# Altium PCB NX32F001T-塑料壳扳手角磨链锯通用.PcbDoc
Units mm, origin at the board's own origin, x right, y up, seen from the top; angles counter-clockwise.
Board outline 50 x 59.85 mm, 2 copper layers (Top Layer, Bottom Layer); 106 components, 62 nets, 281 pads, 301 vias.
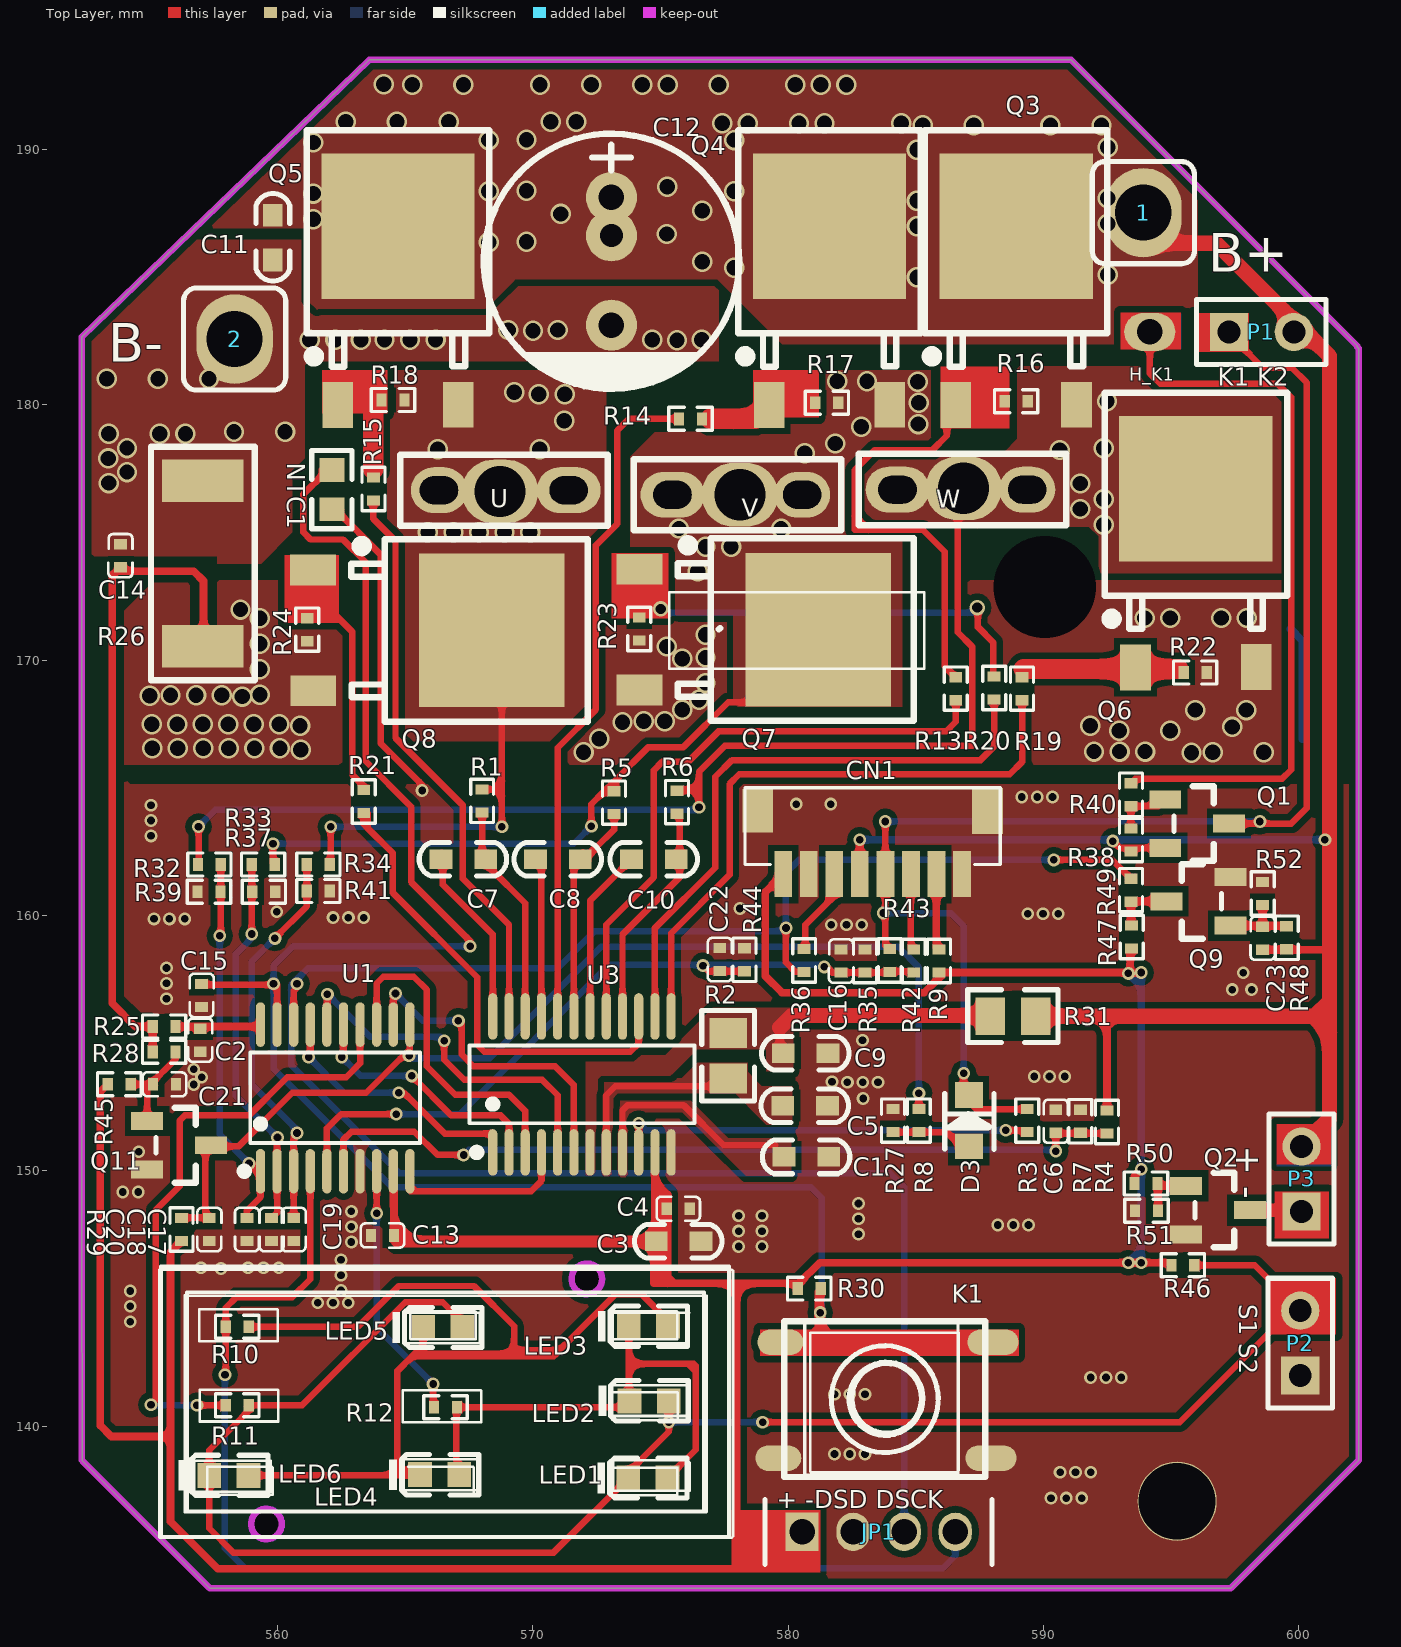
[diagram p0: Top Layer view]
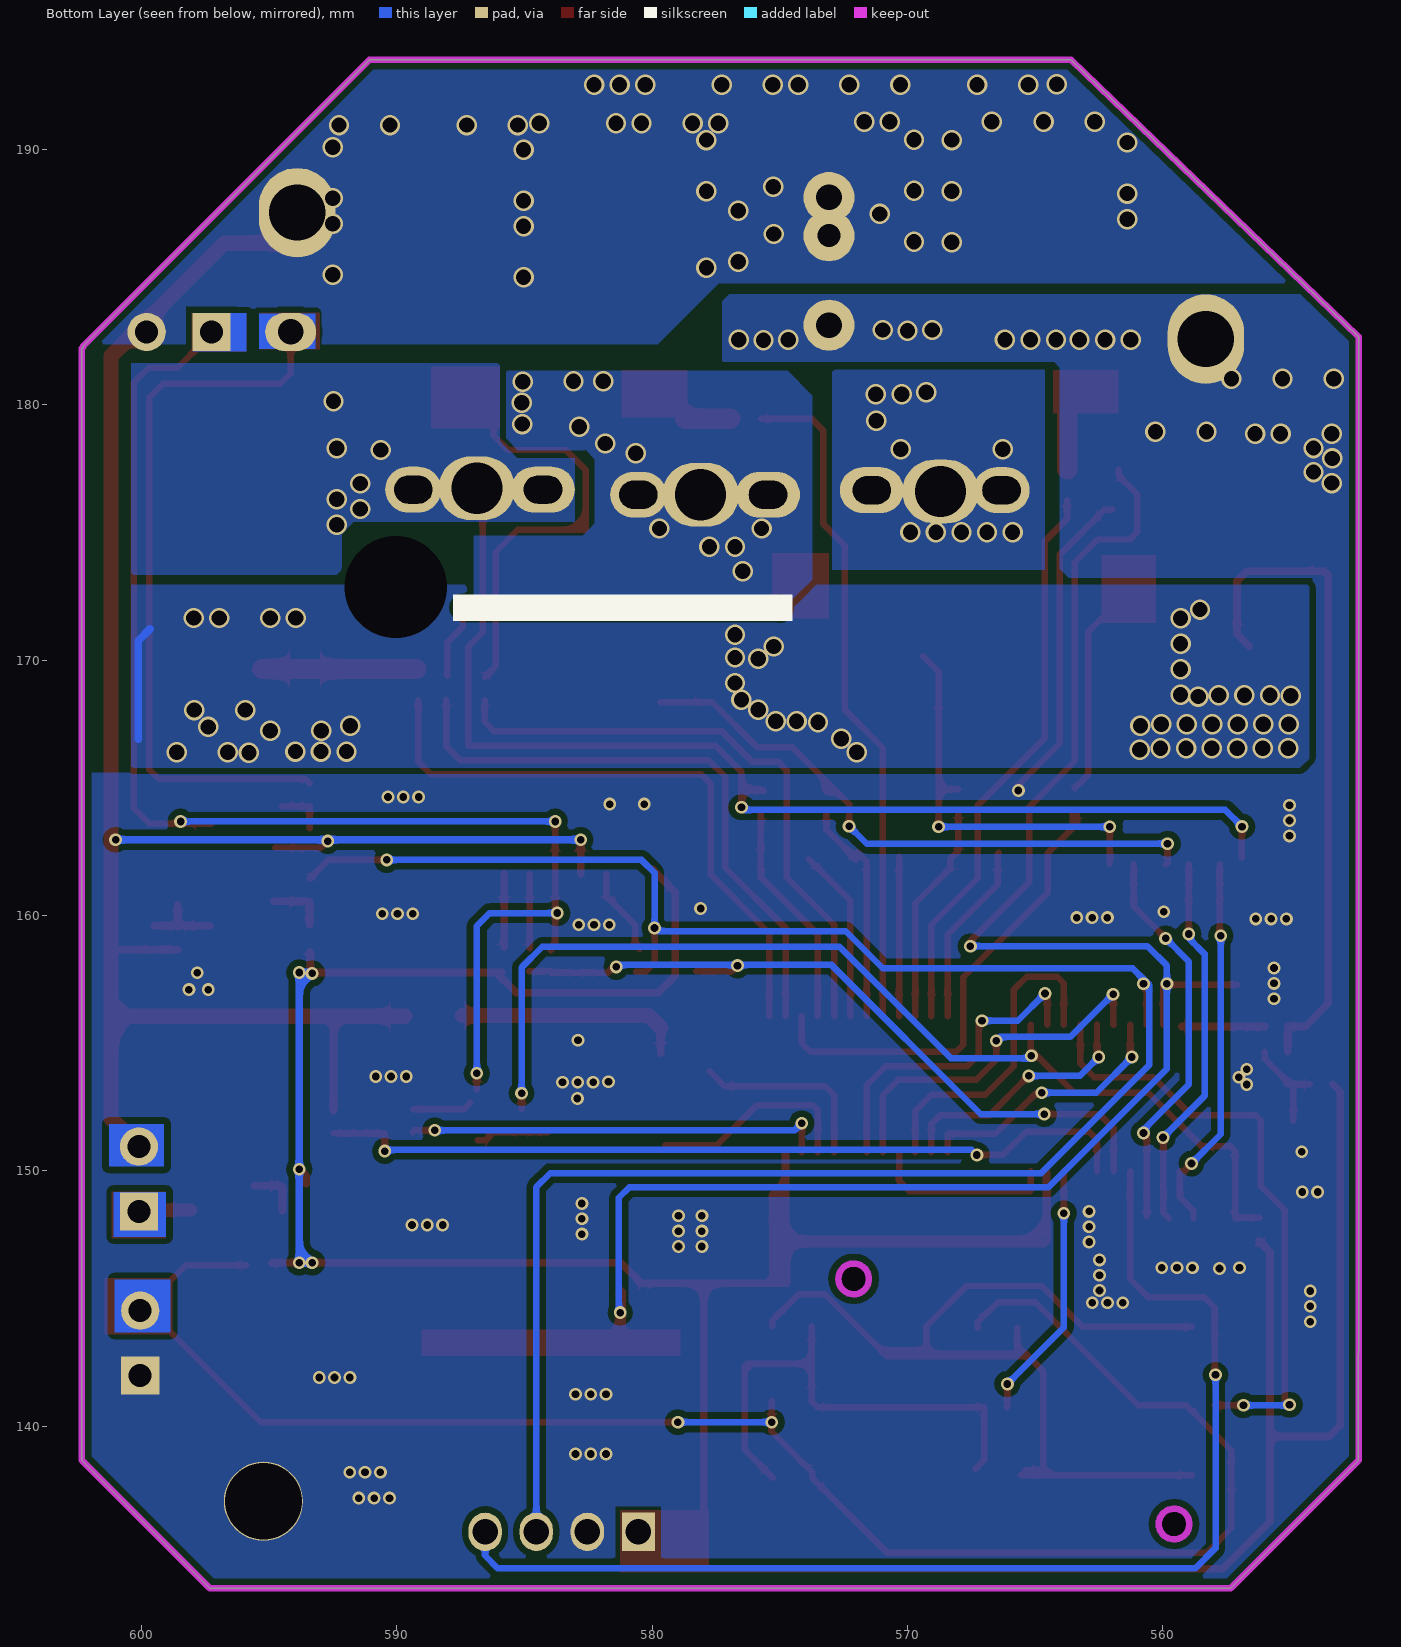
[diagram p1: Bottom Layer view, seen from below]

## Layer stack, top to bottom
Top Solder: solder mask 0.0102, Solder Resist, Dk 3.5
Top Layer: signal copper 0.0356
Dielectric 1: dielectric 0.32, FR-4, Dk 4.8
Bottom Layer: signal copper 0.0356
Bottom Solder: solder mask 0.0102, Solder Resist, Dk 3.5

## Board outline
552.356,138.638 557.335,133.66 597.335,133.66 602.335,138.66 602.335,182.212 602.286,182.26 602.286,182.308 591.085,193.51 563.585,193.51 552.335,182.663 552.335,182.66 552.335,147.105

## Design rules (kind name [scope] priority, off if disabled: settings)
Clearance [All] p1: gap=0.254
DiffPairsRouting [All] p1: maxlimit=0.3 minlimit=0.3 mostfreqgap=0.3 toplayer_minwidth=0.3 toplayer_maxwidth=6 toplayer_prefwidth=0.3 bottomlayer_minwidth=0.3 bottomlayer_maxwidth=6 bottomlayer_prefwidth=0.3 maxuncoupledlength=12.7
HoleSize [All] p1: absolutevalues=TRUE maxlimit=50 minlimit=0.025 maxpercent=80.000 minpercent=20.000
HoleToHoleClearance [All] p1 off: gap=0.254 allowstackedmicrovias=TRUE
MinimumSolderMaskSliver [All] p1 off: minsoldermaskwidth=0.254
PolygonConnect [All] p1: connectstyle=Direct reliefconductorwidth=0.254 reliefentries=4 polygonreliefangle="90 Angle" airgapwidth=0.254
RoutingVias [All] p1: holewidth=0.711 width=1.27 viastyle="Through Hole" minholewidth=0.711 minwidth=1.27 maxholewidth=0.711 maxwidth=1.27
SilkToSilkClearance [All] p1 off: silktosilkclearance=0.254
SilkToSolderMaskClearance [IsPad] p1 off: minsilkscreentomaskgap=0.254 clearancetoexposedcopper=TRUE
SolderMaskExpansion [All] p1: expansion=0.102
UnpouredPolygon [All] p1: allowunpoured=FALSE
Width [All] p1: maxlimit=5 minlimit=0.254 preferedwidth=0.254 minimp=50.000000 maximp=50.000000 favimp=50.000000
23 further rules are at their usual default settings.

## Components (designator, comment, footprint, x,y, rotation, side; value= is the part's Value field where it differs from the comment)
1 "B+" PAD-16AWG 593.903,187.528 r90 top
2 "B-" PAD-16AWG 558.317,182.575 r90 top
C1 "475/25V" C0603 580.695,150.546 r180 top
C2 "103/25V" C0402 556.971,155.118 r270 top
C3 "475/25V" C0603 575.691,147.244 r180 top
C4 "104/50V" C0402 575.691,148.514 r0 top
C5 "475/25V" C0603 580.644,152.552 r180 top
C6 "104/50V" C0402 590.474,151.943 r90 top
C7 "475/25V" C0603 567.258,162.204 r180 top
C8 "475/25V" C0603 570.967,162.204 r180 top
C9 "105/50V" C0603 580.669,154.61 r180 top
C10 "475/25V" C0603 574.726,162.204 r180 top
C11 "105/50V" C0603 559.816,186.563 r90 top
C12 "470uF/35V" CAP-TH_BD10.0-P5.00-D0.6-FD 573.075,185.623 r270 top
C13 "105/25V" C0402 564.109,147.472 r180 top
C14 "220/50V" C0402 553.847,174.092 r90 top
C15 "104/50V" C0402 557.022,156.87 r270 top
C16 "104/50V" C0402 582.066,158.217 r90 top
C17 "101/25V" C0402 559.765,147.701 r270 top
C18 "101/25V" C0402 558.8,147.701 r270 top
C19 "101/25V" C0402 560.629,147.701 r270 top
C20 "102/16V" C0402 557.327,147.701 r270 top
C21 "102/16V" C0402 555.574,153.391 r0 top
C22 "104/50V" C0402 577.317,158.275 r90 top
C23 "104/50V" C0402 598.576,159.113 r90 top
CN1 "PH1.0-8A" PH1.0-8A 583.3,162 r0 top locked
D3 "1N4148" SOD-323A 587.07,151.968 r90 top
JP1 "+ -DSD DSCK" HDR1X4 583.54,135.865 r0 top
K1 "" DOT6X6SMT 583.819,141.072 r0 top
LED1 "" 0603_LED 574.497,137.973 r180 top
LED2 "" 0603_LED 574.548,140.995 r180 top
LED3 "" 0603_LED 574.523,143.916 r180 top
LED4 "" 0603_LED 566.344,138.1 r180 top
LED5 "" 0603_LED 566.471,143.866 r180 top
LED6 "" 0603_LED 558.089,138.074 r180 top
NTC1 "100K/3950" R0603 562.127,176.682 r90 top
P1 "K1 K2" HDR1X2 597.256,182.855 r0 top
P2 "S1 S2" HDR1X2 600.05,141.986 r90 top
P3 "+ -" HDR1X2 600.1,148.412 r90 top
Q1 "MMBT5401" SOT-23-3 596.011,163.601 r0 top
Q2 "MMBT5551" SOT-23-3 596.824,148.463 r0 top
Q3 "" TO-252-2-180 588.924,180 r270 top
Q4 "" TO-252-2-180 581.609,180 r270 top
Q5 "" TO-252-2-180 564.718,180 r270 top
Q6 "" TO-252-2-180 595.96,169.723 r270 top
Q7 "" TO-252-2-180 574.167,171.196 r180 top
Q8 "" TO-252-2-180 561.391,171.171 r180 top
Q9 "2N7002" SOT-23-3 596.062,160.553 r180 top
Q11 "MMBT3904" SOT-23-3 556.14,151.003 r0 top
R1 "2R" R0402 568.007,164.49 r90 top
R2 "100R" R0805 577.647,154.508 r90 top
R3 "1K" R0402 589.356,151.968 r270 top
R4 "1M/1%" R0402 592.48,151.917 r270 top
R5 "2R" R0402 573.176,164.421 r90 top
R6 "2R" R0402 575.64,164.44 r90 top
R7 "100K/1%" R0402 591.439,151.943 r90 top
R8 "5.1K" R0402 585.114,151.968 r90 top
R9 "1K" R0402 585.902,158.217 r270 top
R10 "1K" R0402 558.419,143.891 r180 top
R11 "1K" R0402 558.419,140.818 r180 top
R12 "1K" R0402 566.572,140.741 r180 top
R13 "51R" R0402 586.562,168.885 r270 top
R14 "51R" R0402 576.174,179.451 r180 top
R15 "51R" R0402 563.753,176.708 r270 top
R16 "10K" R0402 588.924,180.137 r180 top
R17 "10K" R0402 581.508,180.086 r180 top
R18 "10K" R0402 564.515,180.188 r180 top
R19 "51R" R0402 589.153,168.885 r270 top
R20 "51R" R0402 588.061,168.91 r270 top
R21 "51R" R0402 563.372,164.465 r270 top
R22 "10K" R0402 595.935,169.52 r180 top
R23 "10K" R0402 574.167,171.221 r90 top
R24 "10K" R0402 561.162,171.196 r90 top
R25 "100R" R0402 555.556,155.651 r0 top
R26 "R002/1%/3W" "R 2512" 557.073,173.787 r270 top
R27 "30K" R0402 584.098,151.968 r90 top
R28 "1K/1%" R0402 555.556,154.661 r0 top
R29 "5.1K" R0402 556.235,147.701 r90 top
R30 "4.7K/1%" R0402 580.822,145.39 r180 top
R31 "20R" R0805 588.797,156.058 r180 top
R32 "10K/1%" R0402 557.327,162.001 r180 top
R33 "10K/1%" R0402 559.435,162.001 r0 top
R34 "10K/1%" R0402 561.594,162.001 r0 top
R35 "100K" R0402 583.006,158.217 r90 top
R36 "1K" R0402 580.619,158.242 r270 top
R37 "2K/1%" R0402 559.46,160.934 r180 top
R38 "10K" R0402 593.42,162.959 r270 top
R39 "2K/1%" R0402 557.309,160.934 r0 top
R40 "20K" R0402 593.42,164.73 r270 top
R41 "2K/1%" R0402 561.594,160.96 r180 top
R42 "1K" R0402 584.911,158.217 r270 top
R43 "10K" R0402 583.971,158.242 r90 top
R44 "2K" R0402 578.282,158.267 r90 top
R45 "10K/1%" R0402 553.796,153.391 r0 top
R46 "10K/1%" R0402 595.452,146.304 r0 top
R47 "10K" R0402 593.446,159.164 r270 top
R48 "10M" R0402 599.516,159.131 r270 top
R49 "1K" R0402 593.42,160.992 r270 top
R50 "10K/1%" R0402 594.004,149.504 r0 top
R51 "100K/1%" R0402 594.03,148.438 r180 top
R52 "300K" R0402 598.576,160.865 r270 top
U "U" CONN-TH_L6.3-W0.8-EST026 568.858,176.657 r0 top (schematic designator 5)
U1 "NX32F001T" TSSOP20_L6.5-W4.4-P0.65-LS6.4-BL 562.254,152.857 r0 top
U3 "NX6051S" SSOP-24_L8.8-W4.0-P0.64-LS6.2-BL 571.919,153.385 r180 top
V "V" CONN-TH_L6.3-W0.8-EST026 578.002,176.479 r180 top (schematic designator 4)
W "W" CONN-TH_L6.3-W0.8-EST026 586.816,176.682 r180 top (schematic designator 3)

## Footprints (in the part's own frame and the unit in brackets; to place one, negate y for a bottom-side part, rotate by r counter-clockwise, add the part's x,y. Pads: shape width x height; smd on the part's side, far side on the other; paste and mask are expansions set on the pad)
0603_LED [mm]
  rect 0.93x0.98 smd: A(-0.77,0) K(0.77,0)
  silkscreen extent -1.54,-0.79 1.97,0.79, body extent -0.8,-0.4 0.8,0.4, height 0.6
C0402 [mm]
  rect 0.4x0.5 smd: 1(0.45,0) 2(-0.45,0)
  silkscreen extent -0.85,-0.47 0.85,0.47
C0603 [mil] "无极性贴片电容"
  rect 35x30 smd: 1(-35,0) 2(34,0)
  silkscreen extent -67,-26 67,26, body extent -31,-16 31,16, height 32
CAP-TH_BD10.0-P5.00-D0.6-FD [mm]
  round 2 hole 1: 1(-2.5,0) 2(2.5,0)
  silkscreen extent -5,-5 5.08,5
CONN-TH_L6.3-W0.8-EST026 [mm]
  oval 2.2x1.8 hole 1.1 slot 1.5 at 0 deg: 1(-2.54,0)
  oval 2.5x1.8 hole 1.1 slot 1.5 at 0 deg: 2(2.54,0)
  silkscreen extent -4.06,-1.4 4.06,1.4
DOT6X6SMT [mm]
  oval 1.8x1 smd: 1(-4.13,2.22) 3(-4.21,-2.32)
  oval 2x1 smd: 2(4.2,2.22) 4(4.12,-2.32)
  silkscreen extent -3.98,-3.06 3.9,3.04
HDR1X2 [mm] "Connector; Header; 2 Position"
  rect 1.5x1.5 hole 0.9: 1(0,0)
  round 1.5 hole 0.9: 2(2.54,0)
  silkscreen extent -1.27,-1.27 3.81,1.27
HDR1X4 [mm] "Connector; Header; 4 Position"
  rect 1.3x1.5 hole 1: 1(-3,0)
  oval 1.3x1.5 hole 1: 2(-1,0) 3(1,0) 4(3,0)
  silkscreen extent -4.44,-1.27 4.44,1.27
PAD-16AWG [mm] "PTH for 16 AWG wire"
  oval 3.5x3 hole 2.2: 1(0,0)
  silkscreen extent -2,-2 2,2, body extent -0.59,-0.52 3.54,0.48, height 14.89
PH1.0-8A [mm]
  rect 1.2x1.7 smd: 0(-4.5,2.1)
  rect 1.2x1.8 smd: 0/2(4.5,2.1)
  rect 0.7x1.8 smd: 1(-3.5,-0.375) 2(-2.5,-0.375) 3(-1.5,-0.375) 4(-0.5,-0.375) 5(0.5,-0.375) 6(1.5,-0.375) 7(2.5,-0.375) 8(3.5,-0.375)
  silkscreen extent -5,0 5,3
R0402 [mm]
  rect 0.4x0.5 smd: 1(0.45,0) 2(-0.45,0)
  silkscreen extent -0.85,-0.45 0.85,0.45
R0603 [mm]
  rect 0.93x0.98 smd: 1(0.77,0) 2(-0.77,0)
  silkscreen extent -1.54,-0.79 1.53,0.79, body extent -0.85,-0.4 0.85,0.4, height 0.56
R0805 [mm]
  rect 1.16x1.47 smd: 1(0.89,0) 2(-0.89,0)
  silkscreen extent -1.77,-1.03 1.77,1.04, body extent -1,-0.63 1,0.63, height 0.49
"R 2512" [mm] "1W贴片电阻"
  rect 1.65x3.2 smd: 1(-3.24,0) 2(3.24,0)
  silkscreen extent -4.57,-2.03 4.57,2.03, body extent -3.2,-1.6 3.2,1.6, height 0.55
SOD-323A [mm]
  rect 1x1.1 smd: 1(-1.003,0) 2(1.003,0)
  silkscreen extent -1.13,-0.98 1.06,0.95
SOT-23-3 [mm]
  rect 1.25x0.7 smd: 1(-1.25,0.95) 2(-1.25,-0.95) 3(1.25,0)
  silkscreen extent -0.9,-1.46 0.65,1.46, body extent -1.5,-1.5 1.5,1.5, height 1.3
SSOP-24_L8.8-W4.0-P0.64-LS6.2-BL [mil]
  oval 14x71.8 smd: 1(137.5,104.8) 2(112.5,104.8) 3(87.5,104.8) 4(62.5,104.8) 5(37.5,104.8) 6(12.5,104.8) 7(-12.5,104.8) 8(-37.5,104.8) 9(-62.5,104.8) 10(-87.5,104.8) 11(-112.5,104.8) 12(-137.5,104.8) 13(-137.5,-104.8) 14(-112.5,-104.8) 15(-87.5,-104.8) 16(-62.5,-104.8) 17(-37.5,-104.8) 18(-12.5,-104.8) 19(12.5,-104.8) 20(37.5,-104.8) 21(62.5,-104.8) 22(87.5,-104.8) 23(112.5,-104.8) 24(137.5,-104.8)
  silkscreen extent -173,-60 173,111
TO-252-2-180 [mm] "180度编带包装"
  rect 1.8x1.2 smd: 1(0,-2.361) 3(-0.004,2.361)
  rect 5.7x6 smd: 2(-7,0)
  silkscreen extent -10.75,-3.57 -1.5,3.57, body extent -9.74,-3.27 0.2,3.27, height 2.44
TSSOP20_L6.5-W4.4-P0.65-LS6.4-BL [mm]
  oval 0.364x1.742 smd: 1(-2.925,-2.871) 2(-2.275,-2.871) 3(-1.625,-2.871) 4(-0.975,-2.871) 5(-0.325,-2.871) 6(0.325,-2.871) 7(0.975,-2.871) 8(1.625,-2.871) 9(2.275,-2.871) 10(2.925,-2.871) 11(2.925,2.871) 12(2.275,2.871) 13(1.625,2.871) 14(0.975,2.871) 15(0.325,2.871) 16(-0.325,2.871) 17(-0.975,2.871) 18(-1.625,2.871) 19(-2.275,2.871) 20(-2.925,2.871)
  silkscreen extent -3.71,-3.02 3.33,1.77

## Part data
1 2 U V W: library part EST026, "接线插片"
C1 C2 C3 C4 C5 C6 C7 C8 C9 C10 C11 C13 C14 C15 C16 C17 C18 C19 C20 C21 C22 C23: library part C, "无极性电容"
C12: library part CAP+, "直插电解电容"
CN1: library part CON8, "8pin 开关贴片座子"
D3: library part DIODE, "二极管"
JP1: library part HEAD4, "4PIN端子"
K1: library part TS-1002S-07526C, "轻触按键"
LED1 LED2 LED3 LED4 LED5 LED6: library part "0603 蓝灯", "发光二极管"
NTC1: library part Res, "贴片热敏电阻"
P1 P2 P3: library part "Header 2", "Header, 2-Pin"
Q1: library part "SOT-23 SS8550 Y2", "PNP三极管"
Q2 Q11: library part 2N3904, "NPN General Purpose Amplifier"
Q3 Q4 Q5 Q6 Q7 Q8 Q9: library part NCE3050K, "N-Channel mosfet"
R1 R3 R4 R5 R6 R7 R8 R9 R10 R11 R12 R25 R27 R28 R29 R32 R33 R34 R35 R36 R37 R38 R39 R40 R41 R42 R43 R44 R45 R46 R47 R48 R49 R50 R51 R52: library part R, "贴片电阻"
R2 R13 R14 R15 R16 R17 R18 R19 R20 R21 R22 R23 R24 R31: library part RES, "贴片电阻"
R26: library part R, "贴片合金电阻"
R30: library part Res, "贴片电阻"
U1: library part 0001, "主控IC"
U3: library part HC89F0531-SSOP24-T-M, "合封驱动IC"

## Free pads (board coordinates)
  round 0 hole 1.2 unplated: 0(559.511,136.144) 0(572.135,145.796)
  oval 3x2.5 hole 2: 0(578.104,176.479) 1(568.706,176.606) 2(586.867,176.733)
  round 0 hole 4: 0(590.042,172.872)
  round 3.1 hole 3: 0(595.224,137.058)
  oval 2x1.5 hole 1: 1(594.157,182.855)
  round 2 hole 0.9: 4(573.075,186.623)

## Via types
v1: diameter 0.8, hole 0.6, Top Layer to Bottom Layer, tented both sides, 157 vias
v2: diameter 0.5, hole 0.3, Top Layer to Bottom Layer, tented both sides, 142 vias
v3: diameter 0.6, hole 0.4, Top Layer to Bottom Layer, tented both sides, 2 vias

## Nets (pads, with @x,y where several pads share a name; then routed paths per layer and width w, separated by ;. In a path a pad name is that pad's centre, name@x,y a point inside that pad or via, vN(x,y) a via of type N, cw(c..) or ccw(c..) an arc to the next point about the centre after c; other vN are vias at no path point)
+5V: C3.2 C4.2 C13.2 CN1.1 JP1.1 R9.1 R29.2 R30.1 R45.2 R46.2 R47.1 R50.2 U1.9 U3.11 | length 171.3
  Top Layer w0.3: R45.2 553.06,153.104 553.06,140.03 553.491,139.598 555.803,139.598 ; R29.2 555.803,146.819 555.803,139.598 ; 564.529,149.098 564.555,148.017 ; U1.9@564.555,149.935 564.555,148.017 ; C3.2@574.7,147.142 574.37,147.142 ; 574.777,149.25 574.777,149.2 ; U3.11 574.777,149.581 ; C3.2@574.878,147.244 574.878,146.634 ; C3.2@574.878,147.32 574.878,147.879 ; 574.878,148.869 574.878,147.879 ; C3.2@574.996,147.244 574.996,146.136 575.107,146.025 ; 575.107,145.898 575.107,146.025 ; 577.977,145.542 577.977,145.212 ; 578.409,145.593 578.358,145.593 ; CN1.1@579.984,161.809 CN1.1 579.095,160.92 579.095,157.632 579.755,156.972 585.318,156.972 586.112,157.767 R9.1 ; 580.847,134.493 580.54,134.801 JP1.1 ; 586.163,157.767 v2@593.395,157.767 ; v2(593.319,157.734) v2@593.395,157.767 ; R47.1@593.395,158.587 v2@593.395,157.767 ; R50.2 593.554,149.791 v2(593.827,150.063) ; v2(593.819,157.767) v2@593.395,157.767 ; R46.2@594.893,146.406 v2(593.827,146.406) v2(593.319,146.406) 581.228,146.406 580.415,145.593 578.358,145.593 ; 555.803,139.598 555.803,136.271 557.657,134.417 579.092,134.417 JP1.1 ; 564.529,147.726 564.529,147.28 564.667,147.142 565.277,147.142 ; 564.529,147.726 564.555,148.017 ; 564.529,147.726 564.936,147.32 565.277,147.32 ; 564.555,148.017 565.277,147.32 ; 565.277,147.142 565.277,147.32 ; 565.277,147.142 574.37,147.142 ; 565.277,147.32 574.319,147.32 ; 574.319,147.32 574.777,147.777 ; 574.319,147.32 C3.2@574.777,147.32 ; 574.37,147.142 574.726,146.787 ; 574.726,146.787 574.726,147.091 C3.2@574.777,147.142 ; 574.726,146.787 574.726,145.593 574.802,145.593 ; 574.726,146.787 574.777,146.736 ; 574.777,146.736 C3.2@574.777,147.142 ; 574.777,146.736 574.777,146.101 574.878,145.999 ; 574.777,146.736 574.878,146.634 ; C3.2@574.777,147.142 C3.2@574.777,147.32 ; C3.2@574.777,147.32 574.777,147.777 ; 574.777,147.777 574.878,147.879 ; 574.777,147.777 574.777,149.2 ; 574.777,149.2 574.777,149.581 ; 574.777,149.2 575.107,148.869 ; 574.777,149.581 575.285,149.073 C4.2@575.285,148.692 ; 574.802,145.593 575.285,145.593 ; 574.802,145.593 575.043,145.834 ; 574.878,145.999 574.878,146.634 ; 574.878,145.999 575.043,145.834 ; 575.043,145.834 575.285,145.593 ; 575.107,146.025 575.285,145.847 ; 575.107,146.025 575.107,148.869 ; 575.107,148.869 C4.2@575.285,148.692 ; 575.285,145.593 575.285,145.847 ; 575.285,145.593 575.539,145.593 ; 575.285,145.847 575.539,145.593 ; 575.285,145.847 C4.2@575.285,148.692 ; 575.539,145.593 577.596,145.593 ; 577.596,145.593 578.358,145.593 ; 577.596,145.593 577.977,145.212 ; 577.977,145.212 577.977,136.042 578.155,135.865 JP1.1 ; 577.977,145.212 578.358,145.593
  Bottom Layer w0.3: v2(593.819,157.767) 593.351,157.767 v2(593.319,157.734) 593.827,157.226 ; v2@593.827,157.767 593.827,157.226 ; 593.827,146.914 v2(593.319,146.406) v2(593.827,146.406) 593.827,146.914 ; 593.827,146.914 593.827,157.226
BEF_U: C19.2 R34.2 R41.1 U1.3 | length 15.5
  Top Layer w0.254: v2(559.892,159.106) 561.144,160.357 R41.1 R34.2 ; C19.2@560.629,148.227 U1.3 560.629,151.359 v2(560.756,151.486)
  Bottom Layer w0.254: v2(559.892,159.106) 558.978,158.191 558.978,153.391 560.756,151.613 v2(560.756,151.486)
BEF_V: C17.2 R33.2 R37.1 U1.2 | length 15
  Top Layer w0.254: v2(558.985,159.276) R33.2 ; C17.2 559.979,148.365 U1.2 v2@559.979,151.293 ; v2@559.979,151.424 v2@559.979,151.293 ; v2(559.994,151.308) v2@559.979,151.293
  Bottom Layer w0.254: v2(558.985,159.276) 558.985,159.113 558.368,158.496 558.368,152.933 v2(559.994,151.308)
BEF_W: C18.2 R32.2 R39.1 U1.1 | length 14.8
  Top Layer w0.254: v2@557.777,159.2 R32.2 ; C18.2 558.8,148.438 559.329,148.967 U1.1 559.182,149.986 v2(558.876,150.292)
  Bottom Layer w0.254: v2(557.733,159.207) 557.733,151.435 v2(558.876,150.292)
BKIN: C20.2 Q11.3 R8.1 R29.1 U1.11 | length 41.9
  Top Layer w0.254: R29.1@556.209,148.169 C20.2@557.156,148.169 ; C20.2@557.174,148.151 557.174,150.787 Q11.3 557.422,150.971 557.438,150.955 558.47,150.955 560.575,153.06 563.474,153.06 565.179,154.766 U1.11 ; R8.1 v2(585.114,153.043)
  Bottom Layer w0.254: v2(565.15,154.508) 565.252,154.407 568.3,154.407 572.668,158.775 584.302,158.775 585.114,157.963 v2(585.114,153.043)
DIRCTION: JP1.3 R36.1 R49.2 U1.18 | length 82.9
  Top Layer w0.254: U1.18 560.629,157.049 v2@560.832,157.251 ; v2(579.907,159.512) 579.907,158.166 580.281,157.792 R36.1 ; v2(590.398,162.179) 592.684,162.179 R49.2
  Bottom Layer w0.254: JP1.3 584.54,149.368 583.997,149.911 564.769,149.911 560.527,154.153 560.527,157.277 561.188,157.937 570.967,157.937 572.414,159.385 579.78,159.385 v2(579.907,159.512) 579.907,161.671 580.415,162.179 v2(590.398,162.179)
  other v2: 560.756,157.328
DSCK: JP1.4 R10.1 U1.4 | length 47.5
  Top Layer w0.254: v2(557.936,142.011) 557.969,142.044 R10.1 557.969,144.635 558.394,145.059 560.578,145.059 561.279,145.761 U1.4
  Bottom Layer w0.254: v2(557.936,142.011) 557.936,135.23 558.724,134.442 586.054,134.442 586.54,134.928 JP1.4
GND: 2.1 C1.1 C2.1 C3.1 C4.1 C5.1 C6.1 C9.1 C11.1 C12.2 C13.1 C14.1 C15.1 C16.1 C17.1 C18.1 C19.1 C20.1 C21.1 C22.1 CN1.0 CN1.0/2 CN1.2 CN1.8 JP1.2 K1.3 K1.4 NTC1.2 P2.1 pad.0@595.224,137.058 Q2.2 Q9.2 Q11.2 R7.1 R26.1 R27.1 R35.1 R37.2 R39.2 R41.2 R44.1 R51.1 R52.2 U1.7 U3.12 | length 12.7
  Top Layer w0.254: NTC1.2@561.975,175.912 562.008,175.912 562.034,175.887 562.288,175.887 564.032,174.142 564.032,166.751 565.658,165.125 v2(565.658,164.897)
  other v1: 553.39,176.936 554.101,177.368 553.364,177.902 554.101,178.308 553.39,178.867 555.39,178.867 556.39,178.867 558.292,178.943 560.292,178.943 553.314,181.026 555.314,181.026 557.314,181.026 575.64,182.524 561.264,182.55 562.264,182.55 563.264,182.55 564.185,182.55 565.185,182.55 566.185,182.55 574.675,182.55 576.605,182.55 570.001,182.905 569.036,182.931 570.967,182.931
  other v2: 590.29,137.185 590.89,137.185 591.49,137.185 590.645,138.201 591.245,138.201 591.845,138.201 581.806,138.913 582.406,138.913 583.006,138.913 581.806,141.249 582.406,141.249 583.006,141.249 591.839,141.91 592.439,141.91 593.039,141.91 554.228,144.094 554.228,144.694 561.569,144.831 562.169,144.831 562.769,144.831 554.228,145.294 562.483,145.313 562.483,145.913 557.784,146.177 556.997,146.202 558.845,146.202 559.445,146.202 560.045,146.202 562.483,146.513 578.053,147.041 578.968,147.041 562.889,147.212 582.752,147.523 578.053,147.641 578.968,147.641 562.889,147.812 588.207,147.879 588.807,147.879 589.407,147.879 582.752,148.123 578.053,148.241 578.968,148.241 562.889,148.412 582.752,148.723 553.939,149.174 554.539,149.174 554.558,150.749 582.93,152.832 556.717,153.381 582.314,153.467 582.914,153.467 583.514,153.467 581.711,153.492 557.022,153.67 589.629,153.695 590.229,153.695 590.829,153.695 556.717,153.981 582.905,155.118 555.65,156.743 597.383,157.099 598.145,157.099 555.65,157.343 597.814,157.759 555.65,157.943 581.679,159.639 582.279,159.639 582.879,159.639 555.162,159.868 555.762,159.868 556.362,159.868 562.172,159.918 562.772,159.918 563.372,159.918 589.375,160.071 589.975,160.071 590.575,160.071 559.968,160.147 578.104,160.274 555.041,163.119 555.041,163.719 555.041,164.319 580.314,164.363 581.66,164.363 589.147,164.643 589.747,164.643 590.347,164.643
HARDWARE: C21.2 Q11.1 R28.1 R45.1 | length 4
  Top Layer w0.254: R45.1 C21.2@555.015,153.391 ; Q11.1 554.89,153.265 C21.2@555.015,153.391 ; C21.2 C21.2@555.015,153.391 ; R28.1 556.006,154.381 C21.2@555.015,153.391
HIN1: U1.17 U3.1 | length 10.5
  Top Layer w0.254: v2(561.213,154.457) 561.279,154.524 U1.17 ; v2(564.744,153.06) 564.947,153.06 566.547,151.46 568.427,151.46 U3.1
  Bottom Layer w0.254: v2(561.213,154.457) 562.61,153.06 v2(564.744,153.06)
HIN2: U1.15 U3.2 | length 10.1
  Top Layer w0.254: v2(562.508,154.457) 562.58,154.529 U1.15 ; v2(565.252,153.721) 566.801,152.171 568.731,152.171 569.062,151.841 U3.2
  Bottom Layer w0.254: v2(562.508,154.457) 563.245,153.721 v2(565.252,153.721)
HIN3: U1.13 U3.3 | length 13.1
  Top Layer w0.254: U1.13 563.879,157.352 564.134,157.607 565.328,157.607 565.836,157.099 565.836,154.102 566.953,152.984 569.062,152.984 569.697,152.349 U3.3
I_SENSE: C2.2 R25.1 U1.20 | length 3.2
  Top Layer w0.3: R25.1 U1.20@559.252,155.651
KEY: C15.2 K1.1 K1.2 NTC1.1 R30.2 U1.19 | length 85
  Top Layer w0.254: C15.2@557.087,157.288 559.979,157.288 U1.19 ; NTC1.1@561.729,177.452 561.729,177.224 561.01,176.505 561.01,175.006 561.289,174.727 562.559,174.727 563.448,173.838 563.448,166.04 565.226,164.262 565.226,161.315 567.538,159.004 v2(567.538,158.801) ; K1.1 581.304,143.292 ; 580.949,143.662 581.16,143.874 v2@581.16,144.569 ; R30.2@581.16,145.263 v2@581.16,144.569 ; v2(581.254,144.45) 581.254,143.84 ; R30.2 v2@581.272,144.501 ; R30.2@581.279,145.186 v2@581.279,144.501 ; 581.33,143.535 581.304,143.561 ; 581.736,143.535 581.304,143.967 ; K1.2 582.244,143.292 ; v2@581.16,144.569 v2@581.228,144.501 ; v2@581.228,144.501 581.228,143.866 581.254,143.84 ; v2@581.228,144.501 v2@581.272,144.457 ; v2@581.228,144.501 v2@581.272,144.501 ; 581.254,143.84 581.254,143.342 581.304,143.292 ; 581.254,143.84 581.272,143.822 ; 581.272,143.822 581.279,143.815 ; 581.272,143.822 v2@581.272,144.457 ; 581.272,143.822 581.272,143.593 581.279,143.586 ; v2@581.272,144.457 v2@581.279,144.45 ; v2@581.272,144.457 v2@581.272,144.501 ; v2@581.272,144.501 v2@581.279,144.501 ; 581.279,143.586 581.304,143.561 ; 581.279,143.586 581.279,143.815 ; 581.279,143.815 581.279,143.993 ; 581.279,143.993 v2@581.279,144.45 ; 581.279,143.993 581.304,143.967 ; v2@581.279,144.45 v2@581.279,144.501 ; v2@581.279,144.45 581.304,144.424 581.304,143.967 ; 581.304,143.292 581.863,143.292 ; 581.304,143.292 581.304,143.561 ; 581.304,143.561 581.304,143.967 ; 581.863,143.292 582.1,143.528 582.1,143.436 582.244,143.292 ; 581.863,143.292 582.244,143.292
  Bottom Layer w0.254: v2(567.538,158.801) 560.603,158.801 559.841,158.039 559.841,154 564.49,149.352 580.898,149.352 581.304,148.946 581.304,144.501 v2(581.254,144.45)
  other v2: 559.841,157.328
KEY_EN: CN1.5 D3.2 P1.1 Q1.3 R3.2 R43.1 | length 55.8
  Top Layer w0.254: v2(583.8,163.684) CN1.5 583.8,158.813 R43.1@583.971,158.641 ; D3.2@586.867,153.175 v2(586.867,153.822) ; D3.2@587.121,152.667 587.37,152.418 R3.2 ; P1.1 597.256,182.778 598.576,181.458 599.719,181.458 600.304,180.873 600.304,164.211 599.694,163.601 Q1.3
  Bottom Layer w0.254: v2(583.717,160.096) 586.359,160.096 586.867,159.588 v2(586.867,153.822) ; v2(583.8,163.684) v2(598.468,163.684)
LED1: LED1.A LED2.K LED3.K LED4.A R12.2 | length 21.2
  Top Layer w0.254: LED4.A@567.342,138.328 567.004,138.667 567.004,140.741 573.524,140.741 LED2.K 573.753,141.021 573.753,142.13 ; LED3.K 573.753,142.756 ; LED1.A 576.377,139.082 576.377,142.138 ; 573.753,142.13 574.065,142.443 ; 573.753,142.13 573.753,142.443 ; 573.753,142.443 573.753,142.756 ; 573.753,142.443 574.065,142.443 ; 573.753,142.756 574.065,142.443 ; 574.065,142.443 576.072,142.443 ; 576.072,142.443 576.377,142.138 ; 576.072,142.443 576.301,142.443 576.377,142.367 576.377,142.138
LED2: LED1.K LED2.A LED5.A LED6.K P2.2 R11.2 R46.1 | length 69
  Top Layer w0.254: LED5.A 567.241,144.086 566.471,144.856 564.998,144.856 560.959,140.818 559.079,140.818 557.319,139.057 LED6.K 557.319,136 558.267,135.052 570.806,135.052 LED1.K 573.727,138.193 575.318,139.784 v2(575.318,140.157) LED2.A ; v2(578.993,140.157) 595.325,140.157 599.694,144.526 P2.2 598.272,146.304 R46.1
  Bottom Layer w0.254: v2(575.318,140.157) v2(578.993,140.157)
LED3: LED3.A LED4.K LED5.K LED6.A R10.2 | length 45.6
  Top Layer w0.254: LED6.A 564.363,138.074 ; R10.2 563.143,143.891 564.744,145.491 567.69,145.491 569.265,143.916 569.265,143.129 ; LED4.K@565.396,138.278 564.769,138.278 ; LED4.K 565.548,138.074 564.972,138.074 ; LED5.K 565.701,143.172 ; 571.106,143.04 571.043,142.977 ; LED3.A 575.293,144.137 574.269,145.161 573.227,145.161 571.043,142.977 ; 564.363,138.074 564.693,138.405 ; 564.363,138.074 564.972,138.074 ; 564.693,138.405 564.693,138.354 564.769,138.278 ; 564.693,138.405 564.693,142.164 565.277,142.748 ; 564.769,138.278 564.972,138.074 ; 565.277,142.748 565.582,143.053 ; 565.277,142.748 565.582,142.748 ; 565.582,142.748 565.582,143.053 ; 565.582,142.748 569.265,142.748 ; 565.582,143.053 565.701,143.172 ; 565.701,143.172 565.701,142.972 565.836,142.837 568.973,142.837 ; 568.973,142.837 569.265,143.129 ; 568.973,142.837 569.265,142.837 ; 569.265,142.748 569.354,142.748 ; 569.265,142.748 569.265,142.837 ; 569.265,142.837 569.354,142.748 ; 569.265,142.837 569.265,143.129 ; 569.265,143.129 569.417,142.977 ; 569.354,142.748 569.646,142.748 ; 569.417,142.977 571.043,142.977 ; 569.417,142.977 569.646,142.748 ; 569.646,142.748 570.814,142.748 571.043,142.977
LIN1: U1.10 U3.4 | length 7.6
  Top Layer w0.254: U1.10 U1.10@565.179,149.45 ; U3.4 570.332,149.606 569.925,149.2 565.429,149.2 ; U1.10@565.179,149.45 565.179,149.221 565.201,149.2 565.429,149.2 ; U1.10@565.179,149.45 565.429,149.2
LIN2: U1.16 U3.5 | length 14.5
  Top Layer w0.254: U1.16 561.95,155.748 v2(561.95,156.921) ; v2(566.522,155.092) 566.522,154.356 567.309,153.568 570.357,153.568 570.967,152.959 U3.5
  Bottom Layer w0.254: v2(561.95,156.921) 563.626,155.245 566.369,155.245 v2(566.522,155.092)
LIN3: U1.12 U3.6 | length 13
  Top Layer w0.254: U1.12 564.529,156.859 v2(564.617,156.947) ; v2@567.207,155.88 567.207,154.559 567.665,154.102 570.865,154.102 571.602,153.365 U3.6
  Bottom Layer w0.254: v2(564.617,156.947) 565.683,155.88 v2(567.08,155.88)
Net3_1: pad.1@594.157,182.855 R40.2 | length 28.6
  Top Layer w0.254: R40.2 593.594,165.354 599.338,165.354 599.694,165.71 599.694,180.289 599.161,180.823 594.563,180.823 594.157,181.229 pad.1@594.157,182.855
NetC1_2: C1.2 U3.9 | length 8.4
  Top Layer w0.254: U3.9 573.507,152.375 573.71,152.578 575.894,152.578 577.469,151.003 579.492,151.003
NetC5_2: C5.2 R2.2 U3.8 | length 7.5
  Top Layer w0.254: U3.8 572.872,152.959 573.227,153.314 577.165,153.314 R2.2@577.748,153.898
NetC7_1: C7.1 R1.2 U3.22 | length 8.7
  Top Layer w0.254: R1.2 568.007,162.531 568.334,162.204 568.334,161.839 569.697,160.477 U3.22
NetC7_2: C7.2 U3.24 | length 7.2
  Top Layer w0.254: C7.2@566.436,162.458 566.471,162.424 566.471,161.214 568.427,159.258 U3.24
NetC8_1: C8.1 R5.2 U3.19 | length 8.8
  Top Layer w0.254: U3.19 571.602,162.119 C8.1@571.967,162.484 ; 572.483,162.67 573.176,163.363 R5.2
  Top Layer w0.3: C8.1@572.017,162.204 572.483,162.67
NetC8_2: C8.2 U3.21 | length 6.3
  Top Layer w0.254: U3.21 C8.2@570.332,162.306
NetC9_2: C9.2 R2.1 R31.1 U3.7 | length 9
  Top Layer w0.3: C9.2@579.669,154.61 579.669,155.616
  Top Layer w0.6: 579.669,155.616 580.136,156.083 R31.1@587.45,156.083
NetC10_1: C10.1 R6.2 U3.16 | length 8.9
  Top Layer w0.254: U3.16 573.507,159.258 575.742,161.493 R6.2@575.742,164.04
NetC10_2: C10.2 U3.18 | length 6.8
  Top Layer w0.254: U3.18 572.237,160.579 C10.2
NetC14_2: C14.2 pad.0@590.042,172.872 Q6.3 Q7.3 Q8.3 R22.2 R23.2 R24.2 R25.2 R26.2 R28.2 | length 30.8
  Top Layer w0.3: R28.2 R25.2 554.431,155.651 553.517,156.566 553.517,173.304 553.699,173.487 556.712,173.487 557.098,173.101 557.098,171.029 R26.2@556.616,170.547
  Bottom Layer w0.3: 599.669,171.221 600.126,170.764 600.126,166.903
  other v1: 595.792,166.37 571.983,166.395 596.618,166.395 598.618,166.395 591.972,166.421 592.972,166.421 593.972,166.421 560.904,166.493 555.092,166.548 556.092,166.548 557.092,166.548 558.092,166.548 559.092,166.548 560.092,166.548 572.592,166.929 592.963,167.234 594.963,167.234 597.383,167.386 560.879,167.433 591.82,167.437 555.066,167.488 556.066,167.488 557.066,167.488 558.066,167.488 559.066,167.488 560.066,167.488 573.507,167.564 574.345,167.615 575.158,167.615 575.843,168.056 595.932,168.046 597.932,168.046 576.504,168.453 558.618,168.576 554.99,168.605 555.806,168.631 556.806,168.631 557.806,168.631 559.308,168.645 576.758,169.107 559.308,169.645 575.843,170.056 576.758,170.107 575.234,170.536 559.308,170.645 576.758,170.993 559.308,171.645 593.957,171.653 594.957,171.653 596.957,171.653 597.957,171.653 558.546,171.983
NetC23_1: C23.1 Q9.1 R48.2 R52.1 | length 3
  Top Layer w0.3: Q9.1 C23.1@598.576,159.603 ; C23.1 C23.1@598.576,159.603 ; R52.1 C23.1@598.576,159.603 ; R48.2@599.494,159.603 C23.1@598.576,159.603
NetCN1_3: CN1.3 R36.2 | length 3.5
  Top Layer w0.254: R36.2@580.492,158.692 580.669,158.87 580.669,159.639 581.8,160.77 CN1.3
NetCN1_6: CN1.6 R42.2 | length 2.9
  Top Layer w0.254: R42.2@584.8,158.717 CN1.6
NetCN1_7: CN1.7 R9.2 | length 2.9
  Top Layer w0.3: R9.2@585.8,158.768 CN1.7
NetD3_1: D3.1 R8.2 R27.2 | length 2.9
  Top Layer w0.254: R27.2 R8.2 586.217,151.518 586.537,151.198 D3.1@586.837,151.198
NetP3_1: P3.1 Q2.3 | length 2
  Top Layer w0.5: Q2.3 P3.1@600.05,148.463
NetQ1_1: Q1.1 R38.2 R40.1 | length 1.9
  Top Layer w0.254: R38.2 R40.1 Q1.1@594.49,164.28
NetQ2_1: Q2.1 R50.1 R51.2 | length 2
  Top Layer w0.3: R51.2 594.48,149.347 594.546,149.413 Q2.1
NetQ3_1: Q3.1 R13.2 R16.1 | length 17
  Top Layer w0.254: Q3.1@586.207,179.477 586.207,178.79 585.649,178.232 583.387,178.232 582.6,177.444 582.6,175.666 ; R13.2 586.13,169.766 586.13,174.244 585.267,175.108 583.159,175.108 ; 582.6,175.666 582.6,175.108 583.159,175.108 ; 582.6,175.666 583.159,175.108
NetQ4_1: Q4.1 R14.2 R17.1 | length 1.8
  Top Layer w0.8: 576.944,179.451 Q4.1@578.699,179.451
NetQ5_1: Q5.1 R15.2 R18.1 | length 2.6
  Top Layer w0.8: 563.753,177.478 563.753,180.069
NetQ6_1: Q6.1 R19.2 R22.1 | length 6
  Top Layer w0.8: 589.229,169.655 595.274,169.655
NetQ7_1: Q7.1 R20.2 R23.1 | length 15.5
  Top Layer w0.254: v3@587.426,172.187 587.426,171.298 588.035,170.688 588.035,169.639 R20.2@588.035,169.385
  Bottom Layer w0.254: v3(575.005,172.009) 575.158,171.856 v3@587.4,171.856
  other v3: 587.4,172.06
NetQ8_1: Q8.1 R21.2 R24.1 | length 8.5
  Top Layer w0.254: 561.162,171.966 562.069,171.966 562.915,171.12 562.915,165.525 R21.2@563.448,164.991
NetQ9_3: Q9.3 R47.2 R49.1 | length 2.2
  Top Layer w0.3: R47.2@593.42,159.639 R49.1 ; R49.1@593.489,160.553 Q9.3
NetR3_1: R3.1 U3.10 | length 16.5
  Top Layer w0.254: U3.10 v2(574.142,151.867) ; v2(588.518,151.587) 589.313,151.587 R3.1@589.382,151.518
  Bottom Layer w0.254: v2(574.142,151.867) 574.421,151.587 v2(588.518,151.587)
NetR11_1: R11.1 U1.14 | length 24
  Top Layer w0.254: v2(555.041,140.843) 555.219,141.021 555.219,148.463 556.158,149.403 556.158,151.968 556.362,152.171 558.876,152.171 560.375,153.67 562.686,153.67 563.23,154.213 U1.14 ; v2(556.844,140.818) R11.1
  Bottom Layer w0.254: v2@555.066,140.818 v2(556.844,140.818)
NetR12_1: R12.1 U1.8 | length 10.6
  Top Layer w0.254: v2(563.88,148.336) U1.8 ; v2(566.09,141.656) 566.09,140.774 R12.1
  Bottom Layer w0.254: v2(563.88,148.336) 563.88,144.221 563.88,143.866 ; 564.185,143.561 563.88,143.866 ; v2(566.09,141.656) 563.88,143.866
ON/OFF: C16.2 C22.2 R35.2 R42.1 R43.2 R44.2 U1.5 | length 29.2
  Top Layer w0.254: U1.5 561.93,151.669 562.483,152.222 v2(564.642,152.222) ; v2(576.656,158.039) 576.878,157.817 R44.2 ; v2(581.406,157.988) 581.406,158.09 581.729,157.767 C16.2 R35.2 R43.2@583.946,157.767 ; R43.2@583.946,157.817 R42.1@584.81,157.817
  Bottom Layer w0.254: v2(564.642,152.222) 567.131,152.222 572.973,158.064 581.33,158.064 v2(581.406,157.988)
U: pad.1@568.706,176.606 Q5.3 Q8.2 R1.1 R18.2 R34.1 U.1 U.2 | length 16.7
  Top Layer w0.254: R34.1@562.077,162.034 v2(562.077,163.474) ; R1.1 568.445,164.94 ; 568.739,164.94 568.51,164.94 ; v2(568.782,163.474) 568.782,164.668 ; Q8.2@569.4,170.162 568.782,169.544 568.782,165.278 ; 568.445,164.94 568.782,165.278 ; 568.445,164.94 568.51,164.94 ; 568.51,164.94 568.782,164.668 ; 568.782,164.668 568.782,165.278
  Bottom Layer w0.254: v2(562.077,163.474) v2(568.782,163.474)
  other v1: 565.887,175.006 566.887,175.006 567.887,175.006 568.887,175.006 569.887,175.006 566.268,178.257 570.268,178.257 571.221,179.375 570.23,180.416 571.246,180.416 569.265,180.492
UH: R15.1 U3.23 | length 22.4
  Top Layer w0.254: R15.1 563.753,175.531 564.617,174.668 564.617,166.954 567.258,164.313 567.258,161.442 569.062,159.639 U3.23
UL: R21.1 U3.15 | length 19.1
  Top Layer w0.254: R21.1 563.372,163.583 563.524,163.431 ; R21.1@563.524,164.015 563.524,163.431 ; U3.15 574.142,154.991 573.811,154.661 568.096,154.661 567.817,154.94 567.817,157.582 564.515,160.884 564.515,162.44 563.524,163.431
V: pad.0@578.104,176.479 Q4.3 Q7.2 R5.1 R17.2 R33.1 V.1 V.2 | length 24.4
  Top Layer w0.254: v2(559.816,162.814) 559.816,162.07 R33.1 ; v2(572.287,163.5) 572.287,164.363 572.745,164.821 ; R5.1@573.168,164.821 572.745,164.821 ; R5.1@573.227,164.879 573.227,165.303 ; Q7.2@579.679,168.351 577.647,168.351 575.894,166.599 574.523,166.599 573.227,165.303 ; 572.745,164.821 573.227,165.303
  Bottom Layer w0.254: v2(559.816,162.814) 571.602,162.814 v2(572.287,163.5)
  other v1: 576.453,173.482 576.758,174.447 577.758,174.447 575.716,175.158 579.716,175.158 580.644,178.105 581.838,178.486 582.854,179.146 585.089,179.248 585.114,180.086 585.064,180.899 581.914,180.924 583.082,180.924
VBUS: C6.2 R4.1 R7.2 U1.6 | length 32.4
  Top Layer w0.254: U1.6 562.58,151.227 562.889,151.536 565.353,151.536 566.268,150.622 v2(567.284,150.622) ; v2(590.474,150.774) 590.474,151.442 590.499,151.467 R4.1
  Bottom Layer w0.254: v2(567.284,150.622) 567.487,150.825 v2@590.474,150.825
VH: R14.1 U3.20 | length 26.5
  Top Layer w0.254: U3.20 570.967,166.573 572.465,168.072 572.465,174.498 573.303,175.336 573.303,178.994 573.761,179.451 R14.1
VIN: 1.1 C11.2 C12.1 C23.2 CN1.4 P1.2 P3.2 pad.4 Q1.2 Q3.2 Q4.2 Q5.2 R4.2 R31.2 R38.1 R48.1 | length 83.4
  Top Layer w0.254: v2(592.709,162.916) 592.973,162.651 Q1.2
  Top Layer w0.3: CN1.4 v2(582.8,162.969) ; 591.998,156.058 592.48,155.575 ; R4.2 592.48,155.575 ; 592.48,155.931 592.48,155.651 ; 592.887,156.058 592.48,155.651 ; C23.2 601.105,158.663 ; 592.48,155.575 592.48,155.651
  Top Layer w0.6: R31.2 591.998,156.058 592.887,156.058 600.558,156.058 ; 1.1@593.674,186.563 593.903,186.334 596.748,186.334 599.796,183.286 P1.2 ; P1.2@599.796,182.677 600.431,182.677 601.193,181.915 601.193,156.642 ; P3.2 601.193,152.044 601.193,155.423 ; 600.558,156.058 600.608,156.058 ; 600.558,156.058 601.193,155.423 ; 600.608,156.058 601.193,156.642 ; 600.608,156.058 600.989,156.058 601.193,156.261 ; 601.193,155.423 601.193,156.261 ; 601.193,156.261 601.193,156.642
  Bottom Layer w0.3: v2(582.8,162.969) 601.012,162.969 v2(601.015,162.966)
  other v1: 585.038,184.992 592.506,185.094 577.875,185.369 576.631,185.602 568.274,186.369 569.747,186.385 575.234,186.69 585.038,186.992 592.506,187.094 561.391,187.274 571.094,187.477 576.631,187.602 585.038,187.992 592.506,188.094 561.391,188.274 568.274,188.369 577.875,188.369 569.747,188.385 575.259,188.544 585.038,189.992 592.506,190.094 561.391,190.274 568.274,190.369 569.747,190.385 577.875,190.369 585.267,190.957 587.267,190.957 590.267,190.957 592.267,190.957 577.418,191.033 578.418,191.033 580.418,191.033 581.418,191.033 584.418,191.033 562.673,191.084 564.673,191.084 566.699,191.084 570.699,191.084 571.699,191.084 565.277,192.532 567.277,192.532 570.277,192.532 572.277,192.532 574.277,192.532 575.277,192.532 577.277,192.532 580.277,192.532 581.277,192.532 582.277,192.532 564.159,192.557
VL: R20.1 U3.14 | length 23.6
  Top Layer w0.254: U3.14 574.777,159.512 577.139,161.874 577.139,165.43 577.799,166.091 587.527,166.091 588.061,166.624 R20.1
W: pad.2 Q3.3 Q6.2 R6.1 R16.2 R32.1 W.1 W.2 | length 48.2
  Top Layer w0.254: 556.903,162.255 v2(556.903,163.482) ; R6.1 576.166,164.89 ; R6.1@575.742,164.94 576.217,164.94 ; 576.46,164.94 576.217,164.94 ; v2(576.504,164.236) 576.504,164.617 ; W.1@589.109,176.725 587.29,176.725 586.638,176.073 586.638,171.094 587.197,170.536 587.197,166.649 577.52,166.649 576.504,165.633 576.504,165.227 ; 576.166,164.89 576.232,164.89 576.504,164.617 ; 576.166,164.89 576.217,164.94 ; 576.217,164.94 576.504,165.227 ; 576.504,164.617 576.504,165.227
  Bottom Layer w0.254: v2(556.903,163.482) 557.555,164.135 576.402,164.135 v2(576.504,164.236)
  other v1: 592.353,175.299 591.439,175.92 592.353,176.299 591.439,176.92 590.626,178.232 592.353,178.299 592.48,180.137
WH: R13.1 U3.17 | length 23.9
  Top Layer w0.254: U3.17 572.872,159.639 574.726,161.493 574.726,165.684 575.056,166.014 576.072,166.014 577.266,167.208 586.181,167.208 586.562,167.589 R13.1
WL: R19.1 U3.13 | length 24.3
  Top Layer w0.254: U3.13 575.412,159.309 577.698,161.595 577.698,165.151 578.079,165.532 588.67,165.532 589.153,166.014 R19.1

## Polygon pours and split planes (outlines as drawn)
GND on Top Layer "Top Layer-No Net" (solid, remove dead copper, pour order 19): 551.967,174.371 551.332,173.736 551.332,137.084 551.51,137.084 554.126,134.468 555.701,132.893 576.097,132.893 603.377,132.893 603.504,133.02 608.33,137.846 608.33,165.151 554.228,165.151 553.72,165.659 553.872,165.811 553.872,179.527
NetC1_2 on Top Layer "Top Layer-No Net" (solid, remove dead copper, pour order 18): 573.303,149.758 573.303,152.679 573.303,152.73 573.329,152.756 576.174,152.756 576.859,152.07 577.647,151.282 580.111,151.282 580.111,149.809 579.12,149.809 578.333,149.809 577.037,151.105 575.843,152.298 574.446,152.298 573.913,152.298 573.888,152.273 573.761,152.146 573.761,151.663 573.761,149.835 573.684,149.758
NetC5_2 on Top Layer "Top Layer-No Net" (solid, remove dead copper, pour order 16): 572.643,149.784 572.643,152.552 572.643,153.467 572.795,153.619 575.564,153.619 575.818,153.619 576.428,154.229 578.409,154.229 578.409,153.873 578.688,153.594 578.968,153.314 580.161,153.314 580.161,151.841 580.136,151.816 579.171,151.816 579.145,151.816 578.891,152.07 577.926,153.035 576.986,153.035 573.329,153.035 573.151,152.857 573.151,152.222 573.151,149.835 573.1,149.784
NetC9_2 on Top Layer "Top Layer-No Net" (solid, remove dead copper, pour order 14): 572.059,149.835 572.059,154.534 575.183,154.534 575.945,155.296 577.037,156.388 580.187,156.388 580.187,153.899 579.145,153.899 579.145,154.762 576.428,154.762 576.123,154.457 575.386,153.721 572.897,153.721 572.668,153.721 572.567,153.619 572.541,153.594 572.541,153.391 572.541,149.885 572.491,149.835
W on Top Layer "Bottom Layer-No Net" (solid, remove dead copper, pour order 51): 588.975,181.508 588.975,178.664 588.442,178.13 582.473,178.13 582.371,178.029 582.397,178.003 582.397,175.209 587.35,175.209 587.4,175.158 587.477,175.235 591.769,175.235 592.15,174.854 592.15,173.406 600.405,173.406 600.405,181.508 593.395,181.508
VIN on Top Layer "Bottom Layer-No Net" (solid, remove dead copper, pour order 47): 555.498,187.071 555.65,186.919 561.188,186.919 561.188,184.074 561.543,183.718 561.594,183.769 568.173,183.769 569.316,184.912 577.215,184.912 579.755,182.372 593.065,182.372 596.036,182.372 596.036,193.726 595.427,194.335 555.498,194.335
V on Top Layer "Bottom Layer-No Net" (solid, remove dead copper, pour order 55): 575.64,171.729 575.666,171.755 577.85,171.755 577.85,168.351 577.952,168.25 578.028,168.173 584.454,168.173 584.454,177.343 585.724,178.613 585.572,178.765 585.572,181.356 578.866,181.356 578.699,181.189 578.699,179.451 574.015,179.451 573.735,179.172 573.811,179.095 573.811,171.729
U on Top Layer "Bottom Layer-No Net" (solid, remove dead copper, pour order 56): 564.319,181.363 572.447,181.363 572.879,180.932 572.879,177.426 572.879,169.044 570.662,166.827 565.302,166.827 564.263,167.867
GND on Top Layer "Bottom Layer-No Net" (solid, remove dead copper, pour order 58): 551.463,173.778 559.35,173.778 560.582,175.01 560.582,177.435 561.064,177.918 561.064,178.705 561.064,181.55 561.217,181.702 562.969,181.702 577.27,181.702 577.27,184.776 576.863,184.776 575.178,186.461 549.895,186.461
NetC14_2 on Top Layer "Bottom Layer-No Net" (solid, remove dead copper, pour order 60): 550.199,173.135 600.415,173.135 600.415,166.912 600.415,166.201 600.127,165.913 562.451,165.913 552.435,165.913
GND on Bottom Layer "Top Layer-No Net" (solid, remove dead copper, pour order 46): 551.713,184.328 576.986,184.328 577.139,184.175 577.266,184.048 577.266,183.667 577.266,181.737 577.24,181.712 577.215,181.686 565.302,181.686 564.261,181.686 564.032,181.458 564.032,181.153 564.032,173.584 563.855,173.406 563.677,173.228 553.364,173.228 552.399,173.228 552.221,173.05
NetC14_2 on Bottom Layer "Bottom Layer-No Net" (solid, remove dead copper, pour order 59): 554.634,165.786 600.406,165.786 600.406,172.949 564.059,172.949 554.253,172.949 554.253,166.167
VIN on Bottom Layer "Bottom Layer-No Net" (solid, remove dead copper, pour order 49): 556.256,193.624 593.471,193.624 596.29,190.805 602.666,184.429 602.666,182.372 593.039,182.372 579.78,182.372 577.393,184.76 561.594,184.76 554.628,184.76
W on Bottom Layer "Bottom Layer-No Net" (solid, remove dead copper, pour order 52): 583.032,175.412 591.718,175.412 591.718,175.387 591.998,175.108 592.15,174.955 592.15,173.99 592.15,173.558 592.277,173.431 592.353,173.355 592.963,173.355 600.405,173.355 600.405,181.635 590.753,181.635 585.978,181.635 585.978,178.587 585.851,178.46 585.292,177.902 583.032,177.902
V on Bottom Layer "Bottom Layer-No Net" (solid, remove dead copper, pour order 54): 573.735,178.206 573.735,173.152 574.192,172.695 574.726,172.161 577.774,172.161 586.791,172.161 586.918,172.288 586.994,172.364 586.994,174.879 582.727,174.879 582.473,175.133 582.244,175.362 582.244,175.946 582.244,177.876 582.625,178.257 582.651,178.232 583.59,178.232 585.292,178.232 585.749,178.689 585.724,178.714 585.724,180.594 585.724,181.28 585.673,181.331 578.358,181.331 574.7,181.331 573.735,180.365
U on Bottom Layer "Bottom Layer-No Net" (solid, remove dead copper, pour order 57): 564.617,181.381 564.617,173.533 572.948,173.533 572.948,181.381
GND on Bottom Layer "Top Layer-No Net" (solid, remove dead copper, pour order 19): 551.79,174.371 552.374,173.787 552.374,133.604 605.206,133.604 607.898,130.912 603.428,135.382 603.428,165.583 554.609,165.583 554.228,165.964 554.126,166.065 554.126,176.53

## Keep-outs
Keep-Out Layer:
  circle w0.254: c559.562,136.169 r0.6
  circle w0.254: c572.11,145.771 r0.6
  circle w0.1: c572.085,145.76 r0.65
  circle w0.1: c559.535,136.16 r0.65
  lines w0.254: 552.335,138.66 552.335,147.105 552.335,182.66 ; 552.335,182.663 563.585,193.51 591.085,193.51 602.286,182.308 602.286,182.26 602.335,182.212 602.335,138.66 597.335,133.66 566.199,133.66 557.335,133.66 552.356,138.638

## Other copper
Top Layer:
  region net LED2: 601.447,143.586 601.447,145.796 598.78,145.796 598.78,143.586
  region net NetP3_1: 601.167,147.345 601.167,149.2 599.034,149.2 599.034,147.345
  region net VIN: 601.269,150.241 601.269,151.841 599.11,151.841 599.11,150.241
  region net KEY_EN: 598.043,182.067 598.043,183.591 595.884,183.591 595.884,182.067
  region net Net3_1: 595.376,182.169 595.376,183.617 593.014,183.617 593.014,182.169
  rectangle net NetQ3_1: 585.953,179.07 588.67,181.508
  rectangle net NetQ4_1: 578.612,179.502 581.203,181.356
  rectangle net NetQ5_1: 561.746,179.654 564.312,181.356
  rectangle net NetQ8_1: 560.273,171.45 562.407,174.117
  rectangle net NetQ7_1: 573.075,171.628 575.31,174.193
  rectangle net KEY: 578.891,142.748 589.026,143.789
  rectangle net +5V: 577.774,134.264 581.254,136.728
  pour cut-out: 552.428,154.753 555.091,154.732 555.091,156.21 554.634,156.21 553.999,156.845 553.999,171.933 555.092,173.025 556.565,173.025 556.565,170.84 557.632,170.84 557.632,174.066 552.449,174.066
Bottom Layer:
  region net LED2: 601.066,143.662 601.066,145.745 598.856,145.745 598.856,143.662
  region net NetP3_1: 601.104,147.408 601.104,149.174 599.034,149.174 599.034,147.408
  region net VIN: 601.269,150.165 601.269,151.841 599.11,151.841 599.11,150.165
  region net KEY_EN: 597.992,182.093 597.992,183.591 595.884,183.591 595.884,182.093
  region net Net3_1: 595.401,182.194 595.401,183.571 593.191,183.571 593.191,182.194

## Silkscreen, mask and mechanical layers (free items; w line width, h text height)
Top Overlay:
  circle w0.254: c583.854,141.092 r1.391
  lines w0.1: 559.98,143.333 556.932,143.333 556.932,144.578 556.957,144.578 559.98,144.578 560.005,144.553 560.005,143.333 ; 565.111,138.406 567.651,138.406 567.676,138.38 567.676,137.314 ; 573.135,138.603 573.135,137.47 576.135,137.47 576.135,138.577 576.042,138.67 573.135,138.67 ; 555.36,135.66 555.36,146.135 ; 555.36,135.66 555.385,135.635 ; 555.36,135.66 555.36,146.135 ; 555.36,135.66 555.385,135.635 ; 555.36,146.135 577.785,146.135 555.36,146.135 ; 555.385,135.635 577.785,135.635 555.385,135.635 ; 556.36,136.635 556.36,145.135 ; 556.36,136.635 576.785,136.635 ; 556.36,136.635 556.36,145.135 ; 556.36,136.635 576.785,136.635 ; 556.36,145.135 556.385,145.11 ; 556.36,145.135 556.385,145.11 ; 556.385,145.11 576.81,145.11 ; 556.385,145.11 576.81,145.11 ; 576.785,136.635 576.81,136.66 ; 576.785,136.635 576.81,136.66 ; 576.81,136.66 576.81,145.11 ; 576.81,136.66 576.81,145.11 ; 556.725,137.44 556.725,138.64 559.725,138.64 559.725,137.44 556.725,137.44 ; 556.957,140.184 560.005,140.184 560.031,140.184 560.031,141.403 560.005,141.428 556.983,141.428 556.957,141.428 556.957,140.184 ; 557.237,137.339 557.262,137.314 559.802,137.314 559.802,138.38 559.777,138.406 557.237,138.406 557.237,137.339 ; 564.908,140.158 567.956,140.158 567.981,140.158 567.981,141.378 567.956,141.403 564.933,141.403 564.908,141.403 564.908,140.158 ; 564.915,143.25 567.915,143.25 567.915,144.45 564.915,144.45 564.915,143.25 ; 564.935,137.5 564.935,138.7 567.863,138.7 567.935,138.628 567.935,137.5 564.935,137.5 ; 565.187,143.435 565.187,144.502 567.727,144.502 567.752,144.476 567.752,143.41 565.212,143.41 565.187,143.435 ; 573.086,137.314 573.086,138.38 575.626,138.38 575.652,138.355 575.652,137.288 573.112,137.288 573.086,137.314 ; 573.086,143.435 573.086,144.502 575.626,144.502 575.652,144.476 575.652,143.41 573.112,143.41 573.086,143.435 ; 573.105,140.4 575.971,140.4 576.105,140.533 576.105,141.6 573.105,141.6 573.105,140.4 ; 573.112,140.26 573.112,141.327 575.652,141.327 575.677,141.301 575.677,140.235 573.137,140.235 573.112,140.26 ; 573.115,143.24 576.031,143.24 576.031,144.356 576.115,144.44 573.115,144.44 573.115,143.24 ; 575.333,169.665 585.333,169.665 585.333,172.665 575.333,172.665 575.333,169.665 ; 577.835,135.685 577.835,146.085 577.835,135.685 ; 580.859,138.228 580.884,138.203 586.599,138.203 586.675,138.279 586.675,143.664 580.859,143.664 580.859,138.228
  lines w0.15: 555.435,135.66 577.675,135.66 577.675,146.26 555.435,146.26 555.435,135.66 ; 556.445,136.67 576.705,136.67 576.705,145.25 556.445,145.25 556.445,136.67
  lines w0.254: 577.285,171.21 577.335,171.26
  text "H_K1" at 593.344,180.95 h0.5
Bottom Overlay:
  rectangle: 574.497,171.526 587.807,172.568
Top Solder:
  rectangle: 555.015,166.04 559.791,168.834
  rectangle: 557.759,166.014 562.331,167.64
  rectangle: 596.24,166.548 600.1,168.351
  lines w1: 581.152,178.13 581.177,178.13 581.914,178.867 581.939,178.867
Bottom Solder:
  rectangle: 554.584,171.145 573.456,172.644
  rectangle: 565.074,175.514 572.491,177.851
  rectangle: 574.37,178.943 585.368,180.797
  rectangle: 574.294,175.235 581.609,177.165
  rectangle: 592.48,173.736 598.881,180.137
  rectangle: 591.718,177.216 596.595,180.111
  rectangle: 554.584,166.065 599.465,171.145
  rectangle: 593.039,165.964 600.126,171.882
  rectangle: 553.466,173.736 563.245,179.781
  rectangle: 576.224,185.293 591.566,191.795
  rectangle: 578.418,184.15 591.642,191.033
  rectangle: 562.407,185.242 570.916,190.906
  rectangle: 561.823,181.991 571.678,183.845
  rectangle: 563.778,190.576 590.728,192.634
  rectangle: 583.184,175.616 590.321,177.698
  lines w1: 562.94,190.83 564.439,192.329 590.448,192.329 591.134,191.643 591.134,186.055 ; 576.859,186.385 578.587,184.658 579.145,184.658